# Altium PCB Zulu_a7_no_pmod.PcbDoc (part 3 of 5)
Units mm, origin at the board's own origin, x right, y up, seen from the top; angles counter-clockwise.
Board outline 60.96 x 25.4 mm, 6 copper layers (Top Layer, L2-GND, L3-SIG, L4-SIG, L5-VCC3V3, Bottom Layer), stack 1.65 mm thick; 194 components, 181 nets, 868 pads, 1982 vias.
Unrouted connection lines stored in the file: 27.
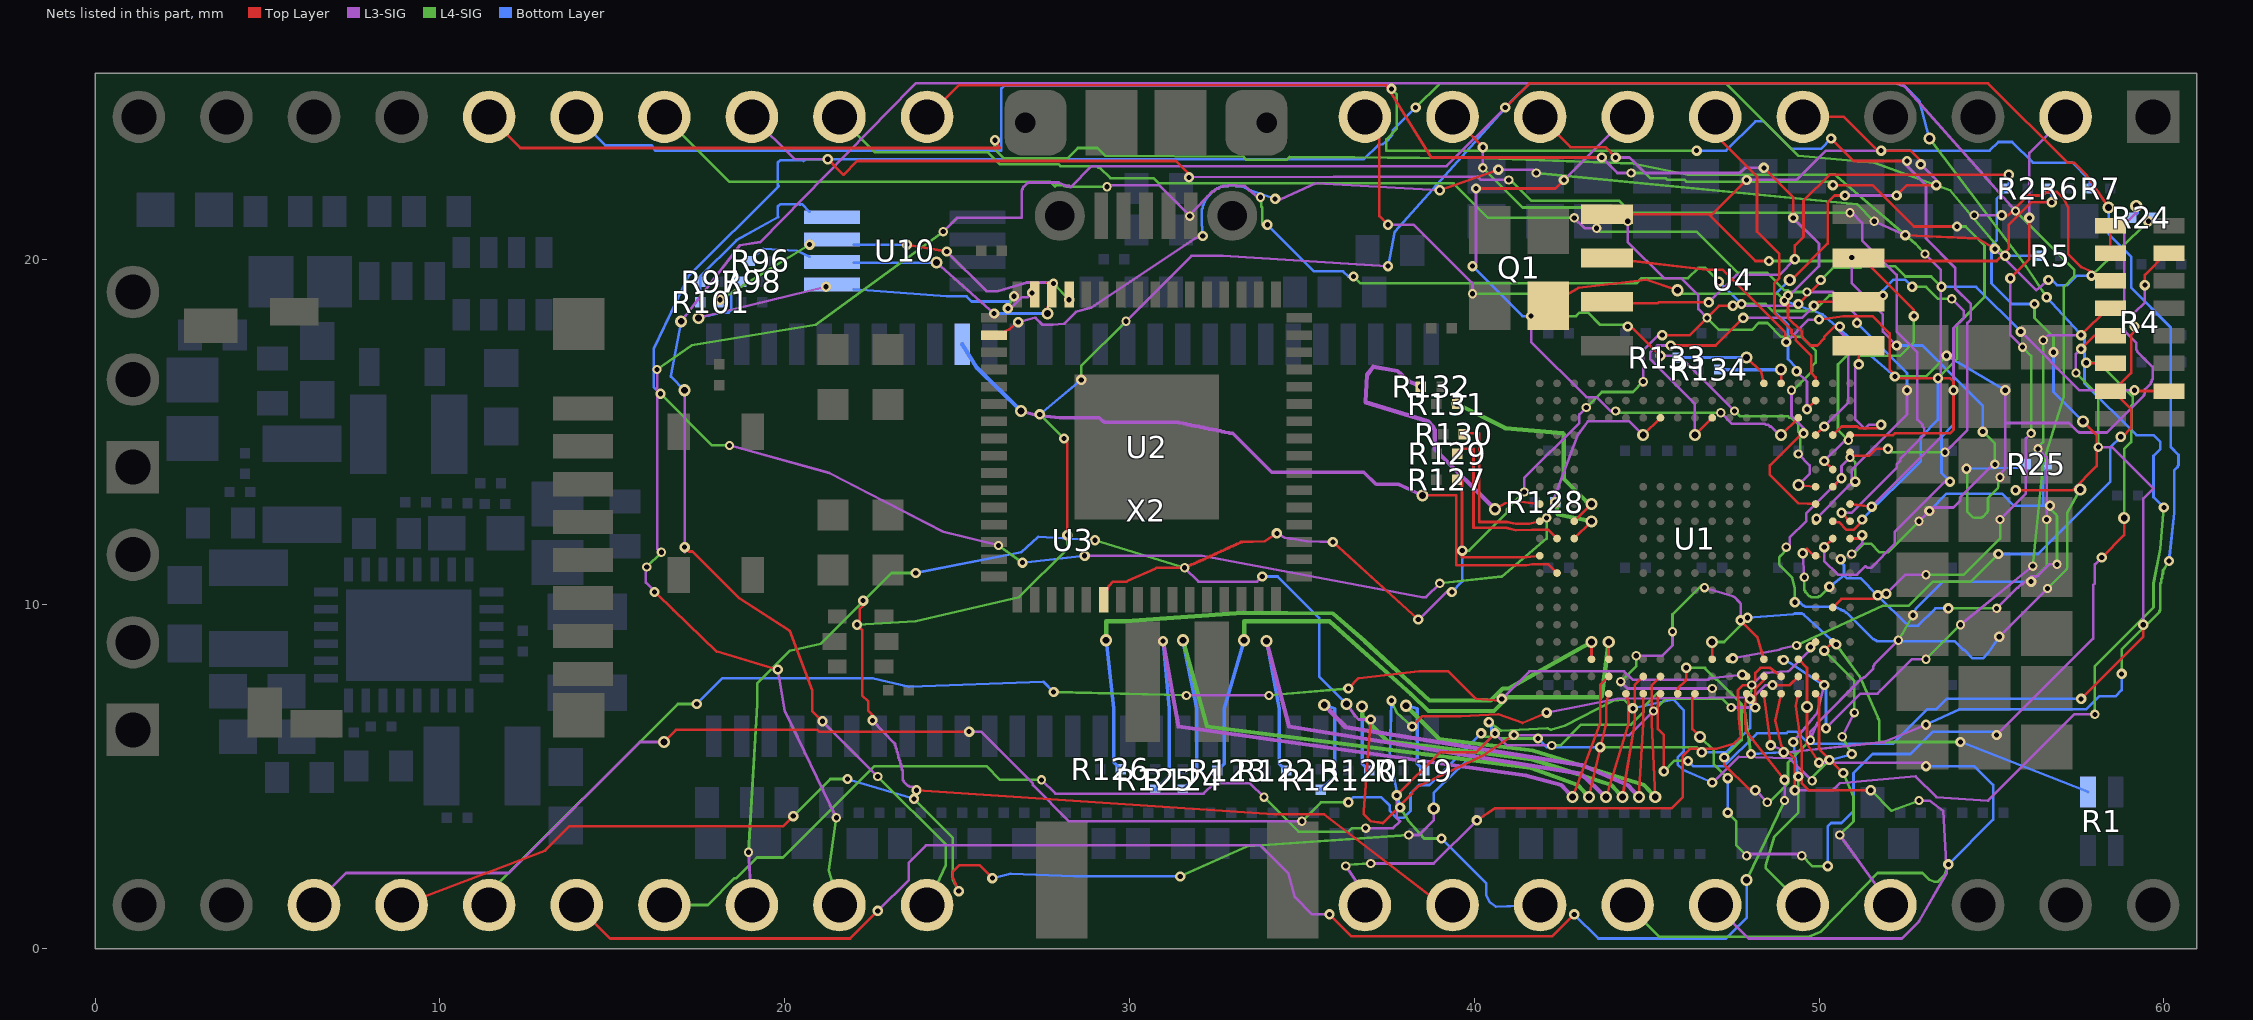
[diagram p6: the nets of this part, all layers, seen from the top]

## Via types
v1: diameter 0.27, hole 0.15, L3-SIG to L4-SIG, tented both sides, 400 vias
v2: diameter 0.3, hole 0.15, Top Layer to L2-GND, tented both sides, 336 vias
v3: diameter 0.35, hole 0.2, Top Layer to Bottom Layer, tented both sides, 322 vias
v4: diameter 0.3, hole 0.15, L5-VCC3V3 to Bottom Layer, tented both sides, 321 vias
v5: diameter 0.3, hole 0.15, L2-GND to L3-SIG, tented both sides, 302 vias
v6: diameter 0.3, hole 0.15, L4-SIG to L5-VCC3V3, tented both sides, 301 vias

## Nets (pads, with @x,y where several pads share a name; then routed paths per layer and width w, separated by ;. In a path a pad name is that pad's centre, name@x,y a point inside that pad or via, vN(x,y) a via of type N, cw(c..) or ccw(c..) an arc to the next point about the centre after c; other vN are vias at no path point) (continued)
CHAN2: U1.B17 X2.5 | length 15.6
  Top Layer w0.076: v3(49.15,19.4) 49.2,19.4 50.25,20.45 50.25,21.65 50.45,21.85 v2(50.75,21.85) ; X2.5@49.53,24.13 50.72,24.13 51.7,23.15 52.65,23.15 52.95,22.85 v2(52.95,22.75) ; v2(49.65,15.65) U1.B17@49.9,15.9 ; v2(52.25,21.85) 52.55,22.15 v2(53.4,22.15)
  L3-SIG w0.076: v1(49.35,16.75) 49.65,16.45 v2(49.65,15.65) ; v2(50.75,21.85) v2(52.25,21.85) ; v2(52.95,22.75) 53.4,22.3 v2(53.4,22.15)
  Bottom Layer w0.076: v3(49.15,19.4) 48.7,18.95 48.7,18.5 49.1,18.1 49.1,17.1 49.35,16.85 v1(49.35,16.75)
  other v4: 49.35,16.75
  other v5: 49.65,15.65 50.75,21.85 52.25,21.85 53.4,22.15 52.95,22.75
  other v6: 49.35,16.75
CHAN3: U1.A17 X2.6 | length 9.1
  Top Layer w0.076: X2.6@46.99,24.13 46.99,23.61 48.2,22.4 48.2,20.8 48.85,20.15 48.85,19.45 48.7,19.3 48.7,18.45 49.2,17.95 49.2,17.85 49.325,17.725 49.325,17.65 49.775,17.2 49.775,16.7 49.9,16.575 U1.A17@49.9,16.4
CHAN4: U1.C16 X2.7 | length 19.7
  Top Layer w0.076: v2(40.05,22.05) 42.35,22.05 v2(42.6,22.3) ; v3(48.9,14.9) U1.C16@49.4,15.4
  L3-SIG w0.076: v1(39.95,19.8) 40.05,19.9 v2(40.05,22.05) ; v1(41.65,18.35) 41.65,17.6 43.25,16 43.55,16 43.95,15.6 v1(44.1,15.6) ; v2(42.6,22.3) 44.43,24.13 X2.7@44.45,24.13 ; v1(47.15,15.55) 47.475,15.225 48.425,15.225 48.45,15.2 48.525,15.2 48.575,15.15 48.6,15.15 48.85,14.9 v3(48.9,14.9)
  L4-SIG w0.076: v1(44.1,15.6) 44.15,15.55 v1(47.15,15.55)
  Bottom Layer w0.076: v1(39.95,19.8) 41.4,18.35 v1(41.65,18.35)
  other v4: 41.65,18.35 39.95,19.8
  other v5: 40.05,22.05 42.6,22.3
  other v6: 41.65,18.35 39.95,19.8
CHAN5: U1.D17 X2.8 | length 18.5
  Top Layer w0.076: X2.8@41.91,24.13 42.79,23.25 43.8,23.25 v2(44.1,22.95) ; v2(48.4,22.65) 49.25,21.8 v2(49.25,21.2) ; v2(49.1,18.95) 49.1,18.3 49.5,17.9 49.5,17.75 49.75,17.5 49.95,17.5 50.15,17.7 50.15,17.75 50.45,18.05 v2(50.6,18.05) ; U1.D17@49.9,14.9 v2(50.15,15.15)
  L3-SIG w0.076: v2(44.1,22.95) 44.5,22.95 44.95,22.5 47.7,22.5 47.85,22.65 v2(48.4,22.65) ; v2(49.1,18.95) 49.15,18.95 50,19.8 50,20.45 v2(49.25,21.2) ; v2(50.15,15.15) 50.85,15.85 50.85,17.65 50.6,17.9 v2(50.6,18.05)
  other v5: 50.15,15.15 50.6,18.05 49.1,18.95 49.25,21.2 48.4,22.65 44.1,22.95
CHAN6: U1.H17 X2.9 | length 20.6
  Top Layer w0.076: X2.9@39.37,24.13 v2(40.25,23.25) ; v2(49.55,14.95) 49.5,14.95 48.575,14.025 48.575,13.745 49.4,12.92 U1.H17@49.9,12.9
  L3-SIG w0.076: v1(40.25,22.65) v2(40.25,23.25) ; v1(44.45,21.1) 44.45,20.5 45.5,19.45 46,19.45 46.5,18.95 46.5,18.55 v1(46.75,18.3) ; v1(49.2,16.2) 49.2,15.45 49.55,15.1 v2(49.55,14.95)
  L4-SIG w0.076: v1(40.25,22.65) 41.4,21.5 44.05,21.5 v1(44.45,21.1) ; v1(46.75,18.3) 47.1,17.95 48.05,17.95 48.25,18.15 48.5,18.15 48.9,17.75 49.5,17.75 49.9,17.35 49.9,17 49.8,16.9 49.8,16.75 49.25,16.2 v1(49.2,16.2)
  other v5: 49.55,14.95 40.25,23.25
CHAN7: U1.G17 X2.10 | length 19.8
  Top Layer w0.076: X2.10@37.25,23.55 37.25,21.25 v2(37.5,21) ; v2(44.45,18.05) 44.55,18.05 v2(45.4,17.2) ; v3(49.4,13.45) U1.G17@49.9,13.4
  L3-SIG w0.076: v2(37.5,21) 38.25,21 39.95,19.3 v1(39.95,19) ; v2(45.4,17.2) 45.95,17.2 v1(47.55,15.6) ; v3(49.4,13.45) 49.725,13.775 49.725,14.025 v1(49.4,14.35)
  L4-SIG w0.076: v1(39.95,19) 41.95,19 42.6,18.35 42.95,18.35 43.05,18.45 43.3,18.45 43.65,18.1 44.4,18.1 v2(44.45,18.05) ; v1(47.55,15.6) 47.7,15.45 49.1,15.45 49.15,15.4 49.2,15.4 49.4,15.2 49.4,15 49.45,14.95 49.45,14.4 v1(49.4,14.35)
  other v1: 44.45,18.05
  other v5: 45.4,17.2 44.45,18.05 37.5,21
CHAN8: U1.J18 X2.11 | length 43.8
  Top Layer w0.076: X2.11@24.13,24.13 25.05,25.05 36.65,25.05 37.45,25.05 38.75,22.95 v2(43.7,22.95) ; U1.J18@50.4,12.4 50.425,12.375 50.575,12.375 50.8,12.15 51,12.15 51.25,12.4 v2(51.25,12.45) ; v2(50.4,22.15) 51.55,22.15 52.75,20.95 v2(54,20.95)
  L3-SIG w0.076: v2(43.7,22.95) 44.15,22.5 v1(44.55,22.5)
  L4-SIG w0.076: v1(44.55,22.5) 44.95,22.5 45.1,22.35 45.55,22.35 45.6,22.3 46.1,22.3 46.15,22.25 50.3,22.25 v2(50.4,22.15) ; v6(53.45,16.55) 54,17.1 54,18.1 54.8,18.9 54.8,20.4 54.25,20.95 v2(54,20.95)
  Bottom Layer w0.076: v2(51.25,12.45) 52.95,14.15 52.95,14.85 53.45,15.35 v6(53.45,16.55)
  other v1: 51.25,12.45 54,20.95 50.4,22.15
  other v4: 51.25,12.45 53.45,16.55
  other v5: 51.25,12.45 54,20.95 50.4,22.15 43.7,22.95
  other v6: 51.25,12.45
CHAN9: U1.J17 X2.12 | length 39.5
  L3-SIG w0.076: v1(42.9,21.2) 43.2,20.9 v1(43.55,20.9) ; v1(49.65,19.05) 50.4,19.05 51.1,18.35 v1(51.1,18.15) ; v2(49.925,12.475) 50.925,13.5 50.95,13.55 50.95,13.9 52.55,15.5 v1(52.55,16.2)
  L4-SIG w0.076: X2.12@21.59,24.13 22.62,23.1 25.9,23.1 26.25,22.75 27.95,22.75 28,22.7 29.05,22.7 29.1,22.65 29.15,22.65 29.45,22.35 30.7,22.35 30.85,22.2 39.4,22.2 40.4,21.2 v1(42.9,21.2) ; v1(43.55,20.9) 43.65,20.8 46.45,20.8 47.65,19.6 48.5,19.6 49,19.1 49.1,19.1 49.15,19.05 v1(49.65,19.05)
  Bottom Layer w0.076: v1(51.1,18.15) 52.55,16.7 v1(52.55,16.2)
  other v4: 52.55,16.2 51.1,18.15
  other v5: 49.925,12.475
  other v6: 52.55,16.2 51.1,18.15
CHAN10: U1.J19 X2.13 | length 44.6
  Top Layer w0.076: v2(21.25,22.9) 21.7,22.45 22.1,22.85 31.35,22.85 31.7,22.5 v2(31.725,22.375) ; v2(50.65,12.65) U1.J19@50.9,12.4
  L3-SIG w0.076: X2.13@19.05,24.13 20.28,22.9 v2(21.25,22.9) ; v5@31.725,22.4 v2(31.725,22.375) 40.1,22.4 40.2,22.3 v1(41,22.3) ; v2(50.65,12.65) 50.95,12.65 52.25,13.95 52.25,14.05 52.35,14.15 52.35,14.2 53.05,14.9 53.05,15.1 53,15.15 53,15.2 52.85,15.35 52.85,17.3 52.25,17.9 52.25,19.55 51.25,20.55 51.25,21.05 50.95,21.35 v1(50.9,21.35)
  L4-SIG w0.076: v1(41,22.3) 41.05,22.3 41.65,21.7 44.2,21.7 44.55,21.35 v1(50.9,21.35)
  other v5: 50.65,12.65 31.725,22.375 21.25,22.9
CHAN11: U1.K18 X2.14 | length 53.9
  Top Layer w0.076: v2(50.15,11.65) U1.K18@50.4,11.9
  L3-SIG w0.076: v1(29.35,22.1) 29.4,22.15 30.85,22.15 v1(31.75,21.25) ; v1@31.725,21.275 32.425,21.975 32.45,21.975 32.5,22.025 32.55,22.05 32.575,22.05 32.6,22.075 32.65,22.1 32.7,22.1 32.725,22.125 32.85,22.125 32.875,22.15 33.075,22.15 33.1,22.125 33.35,22.125 33.475,22 33.5,22 33.7,21.8 v1(33.8,21.8) ; v2(50.15,11.65) 50.15,11.25 50.55,10.85 51.1,10.85 51.35,11.1 51.4,11.05 51.5,11.05 52.2,11.75 52.2,12.1 53.65,13.55 v1(53.8,13.55) ; v1(53.85,18.85) 54.2,18.5 54.2,18.3 53.9,18 v1(53.9,16.2)
  L4-SIG w0.076: X2.14@16.51,24.13 18.39,22.25 27.7,22.25 27.84,22.11 27.85,22.125 ; 27.825,22.125 27.85,22.125 ; 28.172,22.125 28.172,22.1 v1(29.35,22.1) ; 28.25,22.1 28.25,22.125 ; 28.275,22.1 28.25,22.125 ; v1(33.8,21.8) 33.825,21.575 33.825,21.525 33.85,21.5 33.85,21 v6(34,21) ; v6(36.5,19.5) 36.7,19.3 44.7,19.3 44.85,19.45 46.2,19.45 46.5,19.75 46.7,19.75 v6(47.1,19.35) ; v6(47.75,18.7) 48.45,18.7 48.65,18.5 49.85,18.5 50.3,18.95 v6(51.85,18.95) ; v6(52.7,19.2) 53.1,19.2 53.45,18.85 v1(53.85,18.85) ; 27.85,22.125 27.875,22.15 28.075,22.15 28.1,22.125 28.25,22.125
  Bottom Layer w0.076: v6(34,21) 35.35,19.65 36.2,19.65 36.35,19.5 v6(36.5,19.5) ; v6(47.1,19.35) v6(47.75,18.7) ; v6(51.85,18.95) 51.85,19.1 52.15,19.4 52.5,19.4 v6(52.7,19.2) ; v1(53.8,13.55) 53.55,13.8 53.55,14.85 53.9,15.2 v1(53.9,16.2)
  other v4: 53.8,13.55 53.9,16.2 47.75,18.7 51.85,18.95 52.7,19.2 47.1,19.35 36.5,19.5 34,21
  other v5: 50.15,11.65
  other v6: 53.8,13.55 53.9,16.2
CHAN12: U1.E19 X2.15 | length 56.5
  Top Layer w0.076: v2(50.35,23.5) 51,22.85 v2(52.55,22.85) ; U1.E19@50.9,14.4 51,14.3 51.45,14.3 51.65,14.5 v2(52,14.5)
  L3-SIG w0.076: v2(52.55,22.85) 52.55,22.7 53.1,22.15 53.1,20.6 53.95,19.75 53.95,19.15 54.4,18.7 54.4,18.25 54.3,18.15 54.3,15.05 v1(53.65,14.4)
  L4-SIG w0.076: v6(37.6,24.94) 37.75,24.79 37.75,23.78 37.45,23.477 37.45,23.15 v6(46.45,23.15) ; v2(52,14.5) 52.1,14.4 v1(53.65,14.4)
  Bottom Layer w0.076: X2.15@13.97,24.13 14.8,23.3 16.15,23.3 16.25,23.15 26.287,23.15 26.287,24.95 26.377,25.04 37.5,25.04 v6(37.6,24.94) ; v6(46.45,23.15) 47.3,23.15 48.15,24 48.4,24 49.2,23.2 50.05,23.2 v2(50.35,23.5)
  other v1: 52,14.5 50.35,23.5
  other v4: 46.45,23.15 50.35,23.5 37.6,24.94
  other v5: 52,14.5 52.55,22.85 50.35,23.5
  other v6: 50.35,23.5
CHAN13: U1.H19 X2.16 | length 53
  Top Layer w0.076: X2.16@11.43,24.13 12.335,23.225 26.242,23.225 v2(26.1,23.45) ; U1.H19@50.9,12.9 v2(51.525,12.825)
  L3-SIG w0.076: v2(51.525,12.825) 53.525,14.825 53.525,19.7 v1(53.075,20.15)
  L4-SIG w0.076: v2(26.1,23.45) 26.1,23.183 26.363,22.92 28.2,22.92 28.505,23.225 28.6,23.225 29.075,23.225 29.3,23 33.313,22.973 33.4,22.88 34.56,22.88 34.64,22.964 40.325,22.925 44.625,22.775 46.2,22.45 50.475,22.45 50.525,22.4 52.8,20.45 v1(53.075,20.15)
  other v1: 26.1,23.45
  other v5: 51.525,12.825 26.1,23.45
CHAN14: U1.W17 X2.24 | length 7.2
  Top Layer w0.076: U1.W17@49.9,7.4 50,7.3 50,5.8 v2(50.7,5.1)
  L3-SIG w0.076: v1(50.6,3.3) X2.24@52.07,1.27
  L4-SIG w0.076: v1(50.6,3.3) 51,3.7 51,4.4 v2(50.7,5.1)
  other v1: 50.7,5.1
  other v5: 50.7,5.1
CHAN15: U1.V17 X2.25 | length 7.8
  Top Layer w0.076: U1.V17@49.9,7.9 v2(50.15,7.65)
  L3-SIG w0.076: v1(49.25,6) 49.95,6.85 v2(50.15,7.65)
  L4-SIG w0.076: v6(49.4,5) 49.4,3.95 48.7,3.25 48.45,2.425 48.45,2.35 X2.25@49.53,1.27
  Bottom Layer w0.076: v1(49.25,6) v6(49.4,5)
  other v4: 49.4,5 49.25,6
  other v5: 50.15,7.65
  other v6: 49.25,6
CHAN16: U1.W16 X2.26 | length 17.1
  Top Layer w0.076: U1.W16@49.4,7.4 49.325,7.05 49.5,5.8 49.5,4.8 49.7,4.6 v2(51.5,4.6)
  L3-SIG w0.076: X2.26@46.99,1.27 47.96,0.3 52.4,0.3 52.9,0.8 53.7,2.2 53.6,4 53.2,4.3 v1(52.9,4.3)
  L4-SIG w0.076: v2(51.5,4.6) 52.1,4 v1(52.9,4.3)
  other v1: 51.5,4.6
  other v5: 51.5,4.6
CHAN17: U1.U16 X2.27 | length 22.2
  Top Layer w0.076: U1.U16@49.4,8.4 49.65,8.15 v3(49.65,7.02) 49.65,5.95 v2(50,5.4)
  L3-SIG w0.076: v2(50,5.4) 53,5.4 v1(53.1,5.3)
  L4-SIG w0.076: X2.27@44.45,1.27 45.37,0.35 49.7,0.35 50.05,0.5 51.7,2.2 53,2.2 53.2,2 53.35,1.95 53.45,1.95 53.65,2.15 v6(53.75,2.45)
  Bottom Layer w0.076: v1(53.1,5.3) 54.5,5.3 55.05,4.75 55.05,3.75 v6(53.75,2.45)
  other v4: 53.75,2.45 53.1,5.3
  other v5: 50,5.4
  other v6: 53.1,5.3
CHAN18: U1.V16 X2.28 | length 21.4
  Top Layer w0.076: v2(38.2,6.45) 38.5,6.75 39.6,6.75 40.7,6.8 41.4,6.55 v2(42.1,6.85) ; v2(48.65,7.65) 49.15,7.65 U1.V16@49.4,7.9
  L3-SIG w0.076: v2(42.1,6.85) 44.15,7.25 48.1,7.3 48.45,7.65 v2(48.65,7.65)
  L4-SIG w0.076: v6(37.6,7.2) 37.75,6.85 v2(38.2,6.45) ; v6(37.85,4.1) 38.1,3.7 38.55,3.2 v6(39.05,3.2)
  Bottom Layer w0.076: v6(37.6,7.2) 37.55,5.55 v6(37.85,4.1) ; v6(39.05,3.2) 40.35,1.9 40.35,1.55 40.45,1.35 40.625,1.225 X2.28@41.91,1.27
  other v1: 38.2,6.45
  other v4: 39.05,3.2 37.85,4.1 37.6,7.2
  other v5: 38.2,6.45 42.1,6.85 48.65,7.65
CHAN19: U1.W15 X2.29 | length 98.3
  Top Layer w0.076: v2(22.275,10.1) 22.275,9.95 22.175,9.85 22.175,9.475 v2(22.1,9.4) 22.25,9.25 22.25,7.35 22.425,7.175 22.425,6.9 22.55,6.775 v2(22.55,6.625) ; v2(23.825,4.6) 34.2,3.9 35.65,3.9 X2.29@38.8,1.475 ; v2(28.1,14.8) 28.2,14.7 v2(28.2,12) ; U1.W15@48.9,7.4 48.725,6.625 48.9,5.9 49.3,5.5 v2(49.3,4.6)
  L3-SIG w0.076: v2(22.55,6.625) 23.175,5.975 23.2,5.95 23.2,5.9 23.225,5.875 23.225,5.825 23.25,5.8 23.25,5.725 23.275,5.7 23.275,5.65 23.3,5.625 23.3,5.55 23.325,5.525 23.325,5.475 23.35,5.45 23.35,5.375 23.375,5.35 23.375,5.3 23.4,5.275 23.4,5.2 23.425,5.175 23.425,4.9 23.45,4.875 23.45,4.85 23.575,4.725 23.6,4.725 23.625,4.7 23.725,4.7 v2(23.825,4.6) ; v1(29.9,18.2) 31.8,20.1 32.7,20.1 v1(37.5,19.8) ; v2(49.3,4.6) 50.4,4.6 50.6,4.8 52.8,5 53.4,4.4 54.9,4.3 57.4,6.8 v1(58,6.8)
  L4-SIG w0.076: v2(22.1,9.4) 23.8,9.5 26.8,10.2 28.2,11.6 v2(28.2,12) ; v6(27.4,15.5) v2(28.1,14.8) ; v6(28.6,16.5) 28.6,16.9 v1(29.9,18.2) ; v3(53.2,23.5) 56,19.8 v6(56.6,18.9) ; v1(58,6.8) 58,8.2 59.7,9.9 59.7,10.6 59.9,11.6 v6(60,12.8)
  Bottom Layer w0.076: v6(27.4,15.5) v6(28.6,16.5) ; v1(37.5,19.8) 37.7,20.8 41.1,24.6 41.6,25.1 52.4,25.1 52.9,24.6 v3(53.2,23.5) ; v6(56.6,18.9) 57.7,17.7 57.7,16.4 59.2,14.9 59.7,14.9 59.9,14.7 59.9,14.5 59.7,14.3 59.7,13.1 v6(60,12.8)
  other v1: 22.1,9.4 28.2,12 28.1,14.8
  other v4: 60,12.8 27.4,15.5 28.6,16.5 56.6,18.9 37.5,19.8
  other v5: 23.825,4.6 49.3,4.6 22.55,6.625 22.1,9.4 28.2,12 28.1,14.8
  other v6: 37.5,19.8
CHAN20: U1.V15 X2.30 | length 17.4
  Top Layer w0.076: v2(40.075,3.725) 40.6,4.075 45.725,4.075 46.05,4.4 46.05,5.6 46.25,5.8 47.025,5.8 47.525,5.95 47.725,6.125 47.675,6.7 47.65,7.475 47.65,7.5 47.8,7.65 48,7.65 48.15,7.8 48.15,8 48.3,8.15 48.575,8.15 U1.V15@48.9,7.9
  L3-SIG w0.076: v1(36.275,2.4) X2.30@36.65,1.85 ; v1(37,2.475) 38.825,2.475 v2(40.075,3.725)
  L4-SIG w0.076: v1@36.274,2.435 36.275,2.425 v1(36.275,2.4) 36.273,2.435 v1(37,2.475)
  other v5: 40.075,3.725
CHAN21: U1.U15 X2.31 | length 85.7
  Top Layer w0.076: v2(17.1,11.65) 17.225,11.525 17.325,11.525 18.675,10.175 20.15,9.225 20.8,7.5 20.8,6.9 v2(21.1,6.6)
  L3-SIG w0.076: v3(17,18.2) 18.7,20.4 19.3,20.5 23.7,25 23.8,25.1 52.2,25.1 52.5,25 v1(55.7,21.4) ; 17.1,11.5 v3(17.1,16.2) ; v2(21.1,6.6) v1(22.7,5) ; v1(50.2,6.4) 51.2,7.4 51.7,7.4 52.7,8.4 v1(53.1,8.4) ; v1(54.1,9.4) v1(56.2,11.1)
  L4-SIG w0.076: v1(22.7,5) 24.675,3.025 24.675,2.425 X2.31@24.13,1.27 ; v1(53.1,8.4) v1(54.1,9.4) ; v1(55.7,21.4) 57.4,19.7 57.4,19.5 57.1,19.2 57.1,16 56.5,14.1 v1(56.2,11.1)
  Bottom Layer w0.076: v3(17,18.2) 16.7,16.6 v3(17.1,16.2) ; v6(48.975,8.375) 49.15,8.3 50.2,7.6 v1(50.2,6.4)
  other v1: 48.975,8.375
  other v2: 48.975,8.375
  other v4: 50.2,6.4 48.975,8.375
  other v5: 21.1,6.6 48.975,8.375 17.1,11.65
  other v6: 50.2,6.4
CHAN22: U1.W14 X2.32 | length 93.4
  Top Layer w0.076: v2(16.225,10.35) 16.625,9.975 16.775,9.825 18.025,8.625 v2(19.8,8.1) ; v2(40.9,24.4) 41.6,25.1 54.9,25.1 57.2,22.8 57.4,22.8 57.75,22.45 v3(58.4,21.5) ; U1.W14@48.4,7.4 v2(48.6,5.9)
  L3-SIG w0.076: v1(16,11.075) 15.975,10.925 15.975,10.625 16.225,10.375 v2(16.225,10.35) ; v1(16.3,16.8) 16.3,11.6 16.45,11.45 v1@16.475,11.475 ; v1@16.425,11.475 v1(16.425,11.5) ; v2(19.8,8.1) 20,6.9 v1(21.5,3.8) ; v1(24.6,20.8) 25,21.2 26.875,21.2 26.875,22 26.9,22.025 26.9,22.05 26.925,22.1 27.025,22.2 27.05,22.2 27.075,22.225 27.95,22.225 28.125,22.15 28.15,22.125 28.25,22.125 28.275,22.1 ; 28.3,22.1 28.275,22.1 ; v2(40.9,24.4) 39.2,22.7 28.9,22.7 28.287,22.087 28.275,22.1 ; v2(48.6,5.9) 49.1,5.7 51.9,6 v1(53.1,6.5)
  L4-SIG w0.076: v1(16,11.075) v1(16.425,11.5) ; v1(16.3,16.8) 17.3,17.5 20.9,18.1 v1(24.6,20.8) ; v1(21.5,3.8) 21.275,2.275 X2.32@21.59,1.27 ; v6(58.775,7.975) 58.775,8.675 59.875,9.775 59.875,9.8 59.9,9.825 59.9,10.6 59.925,10.625 59.925,10.725 59.95,10.75 59.95,10.85 59.975,10.875 59.975,10.975 60,11 v6(60.15,11.25)
  Bottom Layer w0.076: v1(53.1,6.5) 54.075,6.95 57.75,6.95 58.125,7.325 58.6,7.325 58.775,7.5 v6(58.775,7.975) ; v3(58.4,21.5) 58.4,20.725 59.05,20.075 59.05,19.175 60.2,18.025 60.2,14.55 60.425,14.325 60.425,14.025 60.4,14 60.4,13.975 60.3,13.875 60.3,12.65 v6(60.15,11.25)
  other v4: 53.1,6.5 58.775,7.975 60.15,11.25
  other v5: 48.6,5.9 19.8,8.1 16.225,10.35 40.9,24.4
  other v6: 53.1,6.5
CHAN23: U1.V14 X2.33 | length 45.4
  Top Layer w0.076: v2(37,6.65) 36.8,4 36.8,3.9 37,3.7 37.35,3.65 38.2,4.5 38.2,4.55 38.35,4.7 40.25,5.6 v2(41.15,6.2) ; v2(48.15,7) 48.15,7.55 48.4,7.8 U1.V14@48.4,7.9
  L3-SIG w0.076: v1(18.95,2.8) X2.33@19.05,1.27 ; v1(31.6,11.05) 32,10.65 33.7,10.65 v1(33.85,10.8) ; v3(36.3,7.1) 36.55,6.75 36.65,6.65 v2(37,6.65) ; v2(41.15,6.2) 44.5,6.2 v1(45.2,6.9) ; v1(47.45,7) v2(48.15,7)
  L4-SIG w0.076: v1(18.95,2.8) 19.2,7.1 19.2,7.7 20.15,8.65 21.05,8.85 23.1,10.9 v6(23.8,10.9) ; v6(29,11.85) v1(31.6,11.05) ; v1(45.2,6.9) 45.55,7.25 47.2,7.25 v1(47.45,7)
  Bottom Layer w0.076: v6(23.8,10.9) 26.85,11.5 27.35,11.95 v6(29,11.85) ; v1(33.85,10.8) 34.3,10.8 35.5,9.6 35.5,7.9 v3(36.3,7.1)
  other v4: 33.85,10.8 23.8,10.9 29,11.85
  other v5: 41.15,6.2 37,6.65 48.15,7
  other v6: 33.85,10.8
CHAN24: U1.U14 X2.34 | length 45.8
  Top Layer w0.076: v2(37.75,4.45) 39,5.7 40.05,5.7 v2(40.6,6.25) ; v2(47.725,9.525) 48.2,9.05 48.225,9 U1.U14@48.375,8.475
  L3-SIG w0.076: v1(27.45,4.9) 27.85,4.5 32.15,4.5 32.45,4.8 33.5,4.8 v1(33.9,4.4) ; v1(36.85,3.5) 37.65,3.5 37.85,3.7 37.75,3.8 v2(37.75,4.45) ; v2(40.6,6.25) 40.95,5.9 v1(42.25,5.9) ; v1(44.25,7.75) 44.45,7.55 v1(46.9,7.55) ; v1(44.7,8.5) 45.45,8.5 45.75,8.8 v1(45.75,9.2) ; v1(46.675,10.475) 47.5,10.225 47.55,10.2 47.7,10.05 47.725,10 v2(47.725,9.525)
  L4-SIG w0.076: X2.34@16.51,1.27 17.77,1.27 18.55,2.05 18.6,2.05 19.2,2.65 19.95,2.65 22.6,5.3 25.85,5.3 26.25,4.9 v1(27.45,4.9) ; v1(33.9,4.4) 34.9,3.4 36.35,3.4 36.45,3.5 v1(36.85,3.5) ; v1(42.25,5.9) 42.5,5.9 43.1,6.5 44.55,6.5 44.9,6.85 44.9,7 45.45,7.55 v1(46.9,7.55) ; v1(44.25,7.75) 44.7,8.2 v1(44.7,8.5) ; v1(45.75,9.2) 45.75,9.7 46.6,10.55 v1(46.675,10.475)
  other v5: 37.75,4.45 40.6,6.25 47.725,9.525
CHAN25: U1.W13 X2.35 | length 45
  Top Layer w0.076: X2.35@13.97,1.27 14.94,0.3 21.9,0.3 v2(22.7,1.1) ; v2(35.8,1) 36.44,0.36 42.26,0.36 v2(42.9,1) ; U1.W13@47.9,7.4 47.85,6.975 47.875,6.325 v2(49,4.9)
  L3-SIG w0.076: v2(22.7,1.1) 23.6,2 23.6,2.5 24.1,3 33.8,3 34.6,2.2 34.8,1.5 35.3,1 v2(35.8,1) ; v1(49,4.3) v2(49,4.9)
  L4-SIG w0.076: v3(47.9,2) v1(49,4.3)
  Bottom Layer w0.076: v2(42.9,1) 43.6,0.3 47.3,0.3 47.9,0.9 v3(47.9,2)
  other v1: 42.9,1
  other v4: 42.9,1
  other v5: 35.8,1 42.9,1 22.7,1.1 49,4.9
  other v6: 42.9,1
CHAN26: U1.V13 X2.36 | length 40.5
  Top Layer w0.076: v2(36.35,7.55) 36.65,7.85 38.4,8.05 39.25,8.05 40.05,7.25 40.75,7.2 v2(40.8,7.25) ; v2(47.775,7.95) U1.V13@47.825,7.925
  L3-SIG w0.076: v1(31.65,7.35) v1(34.05,7.35) ; v2(40.8,7.25) 41.6,8.05 44.35,8.05 44.6,7.8 46.8,7.8 ; 46.775,7.8 46.8,7.825 46.85,7.85 v2(47.775,7.95)
  L4-SIG w0.076: X2.36@11.43,1.27 11.43,1.63 16.9,7.1 v6(17.45,7.1) ; v6(27.8,7.45) v1(31.65,7.35) ; v1(34.05,7.35) v2(36.35,7.55)
  Bottom Layer w0.076: v6(17.45,7.1) 18.2,7.85 22.55,7.85 23.6,7.6 27.5,7.75 v6(27.8,7.45)
  other v1: 36.35,7.55
  other v4: 17.45,7.1 27.8,7.45
  other v5: 40.8,7.25 36.35,7.55 47.775,7.95
CHAN27: U1.T18 X2.37 | length 55.8
  Top Layer w0.076: X2.37@8.89,1.27 13.05,2.85 13.75,3.55 19.95,3.55 v2(20.25,3.85) ; v2(25.05,1.675) 24.875,2.075 24.875,2.225 25.075,2.425 25.65,2.425 v2(26.025,2.05) ; v2(50.15,8.65) U1.T18@50.4,8.9
  L3-SIG w0.076: v1(38.1,3.3) 38.4,3.3 38.825,3.725 v3(38.825,4.075) ; v1(46.9,4.825) 46.925,4.825 47.675,5.575 49.15,5.525 v1(49.8,4.875) ; v1(50.675,6.15) v1(51.025,6.85)
  L4-SIG w0.076: v2(20.25,3.85) 21.325,4.925 v6(21.825,4.925) ; v6(23.75,4.35) 24.875,3.225 24.875,2 v2(25.05,1.675) ; v6(31.475,2.1) 33.425,2.975 v1(38.1,3.3) ; v6(40.425,6.575) 40.775,6.325 42.125,6.4 42.225,6.35 42.625,6.475 44.025,7.2 44.35,7.225 v6(44.6,6.975) ; v1(49.8,4.875) 49.8,4.975 v6(50.3,5.475) ; v2(50.15,8.65) 51.025,7.775 v1(51.025,6.85) ; v1(50.675,6.15) v6(50.95,5.65)
  Bottom Layer w0.076: v6(21.825,4.925) v6(23.75,4.35) ; v2(26.025,2.05) 26.55,2.175 28.4,2.1 v6(31.475,2.1) ; v3(38.825,4.075) 38.825,4.525 38.95,4.65 40.5,6.15 40.5,6.5 v6(40.425,6.575) ; v6(44.6,6.975) 45.6,7.2 45.775,7.225 46.075,6.925 46.075,5.725 45.9,5.55 45.9,5.35 46.05,5.2 v1(46.9,4.825) ; v6(50.3,5.475) v6(50.95,5.65)
  other v1: 25.05,1.675 26.025,2.05 20.25,3.85 50.15,8.65
  other v4: 26.025,2.05 31.475,2.1 23.75,4.35 46.9,4.825 21.825,4.925 50.3,5.475 50.95,5.65 40.425,6.575 44.6,6.975
  other v5: 25.05,1.675 26.025,2.05 20.25,3.85 50.15,8.65
  other v6: 26.025,2.05 46.9,4.825
CHAN28: U1.T17 X2.38 | length 51
  Top Layer w0.076: v3(16.5,6) 16.85,6.35 20.95,6.35 21,6.3 v2(25.35,6.3) ; v2(49.75,8.75) U1.T17@49.85,8.85
  L3-SIG w0.076: X2.38@6.35,1.27 7.28,2.2 12,2.2 15.8,6 v3(16.5,6) ; v2(25.35,6.3) 25.7,6.3 27.2,4.8 27.2,4.75 28.25,3.7 v1(35,3.7) ; v1(48.05,7.65) 48.4,8 49.1,8.05 49.15,8.075 49.75,8.675 v2(49.75,8.75)
  L4-SIG w0.076: v1(35,3.7) 35.55,4.25 v6(36.35,4.25) ; v6(40.2,6.25) 40.3,6.15 40.7,6.15 40.75,6.1 v6(41.85,6.1) ; v6(43.65,5.85) 46.45,5.85 v6(46.6,5.7) ; v6@47.95,7.25 v6(48,7.25) v1(48.05,7.65)
  Bottom Layer w0.076: v6(36.35,4.25) 36.5,4.4 37.3,4.4 37.55,4.15 37.55,4 37.75,3.8 37.95,3.8 38.15,4 38.15,4.5 38.4,4.75 38.7,4.75 v6(40.2,6.25) ; v6(41.85,6.1) 42.1,5.85 v6(43.65,5.85) ; v6(46.6,5.7) 47.3,5.7 48,6.4 v6(48,7.25)
  other v4: 36.35,4.25 46.6,5.7 43.65,5.85 41.85,6.1 40.2,6.25 48,7.25
  other v5: 25.35,6.3 49.75,8.75
CHAN-CLK: U1.P18 X2.2 | length 19.2
  Top Layer w0.076: U1.P18@50.4,9.9 50.65,10.15 51.75,10.15 51.9,10.3 v2(51.95,10.3) ; v2(55.55,19.45) 56.1,20 v2(56.1,21.2)
  L3-SIG w0.076: v2(51.95,10.3) 52.5,10.85 v1(53.1,10.85) ; v1(55.25,12.45) 56,13.2 56,14.8 v1(56.15,14.95) ; v2(55.55,19.45) 55.55,17.8 v1(55.9,17.45) ; v2(56.1,21.2) 56.1,23.08 X2.2@57.15,24.13
  L4-SIG w0.076: v1(53.1,10.85) 54.2,10.85 55.25,11.9 v1(55.25,12.45) ; v1(55.9,17.45) 56.15,17.2 v1(56.15,14.95)
  other v5: 51.95,10.3 55.55,19.45 56.1,21.2
CKE: U1.M2 U3.37 | length 21.2
  Top Layer w0.076: v3(38.5,13.15) 39.479,13.15 39.479,11.13 40.9,11.13 41.5,11.13 41.688,11.15 42.15,11.15 U1.M2@42.4,10.9
  L3-SIG w0.1: v3(26.85,15.6) 27.3,15.475 27.975,15.4 29.125,15.4 29.225,15.3 29.25,15.3 29.275,15.275 31.425,15.275 31.45,15.25 31.55,15.25 31.575,15.225 31.65,15.225 31.675,15.2 31.775,15.2 31.8,15.175 31.9,15.175 31.925,15.15 32.025,15.15 32.05,15.125 32.15,15.125 32.175,15.1 32.275,15.1 32.3,15.075 32.4,15.075 32.425,15.05 32.525,15.05 32.55,15.025 32.65,15.025 32.675,15 32.75,15 32.775,14.975 32.875,14.975 32.9,14.95 33,14.95 34.125,13.825 36.8,13.825 37.15,13.475 37.8,13.475 v3(38.5,13.15)
  Bottom Layer w0.125: U3.37@25.15,17.53 25.575,16.85 v3(26.85,15.6)
CLK-12M-FPGA: R25.2 U1.L17 | length 17.9
  Top Layer w0.076: v2(49.525,11.475) 49.65,11.6 U1.L17@49.825,11.425 ; U1.L17@49.975,11.375 U1.L17@50,11.375
  L3-SIG w0.076: v2(49.525,11.475) v1(49.575,10.775) ; v1(55.15,9.875) 55.75,10.475 55.775,10.475 55.875,10.575 55.9,10.575 56.025,10.7 56.05,10.7 56.15,10.8 56.3,10.8 56.35,10.825 56.675,11.15 v1(56.9,11.15)
  L4-SIG w0.076: v1(49.575,10.775) 49.575,10.4 49.6,10.375 49.6,10.35 49.725,10.225 49.75,10.225 49.775,10.2 49.975,10.2 50,10.225 50.025,10.225 v6(50.3,10.5) ; v6@53.1,12.8 v6(53.2,12.7) ; v6(53.75,9.875) v1(55.15,9.875) ; v6(56.7,12.85) 56.7,12.775 56.875,12.6 56.9,12.55 v1(56.9,11.15)
  Bottom Layer w0.076: v6(50.3,10.5) 50.725,10.825 ; v4(50.625,11.3) 50.65,11.2 50.725,11.125 50.725,10.825 ; v6(53.2,12.7) 53.7,13.2 55.3,13.2 55.65,12.85 56.5,12.85 ; v6(53.75,9.875) 53.375,9.875 52.875,9.375 52.575,9.375 v4(51.7,10.25) 51.2,10.75 50.8,10.75 50.725,10.825 ; R25.2@56.5,13.95 56.5,12.85 ; v6(56.7,12.85) 56.5,12.85
  other v4: 53.75,9.875 50.3,10.5 53.2,12.7 56.7,12.85
  other v5: 49.525,11.475
CLK-12M-FT: R24.2 U2.2 | length 37.8
  Top Layer w0.076: U2.2@26.35,17.9 26.525,17.975 v5(26.775,18.175) ; v2(39,22) v2(40.7,22.6) ; v2(52.5,20.7) 54.6,20.6 v2(55.1,20.3)
  L3-SIG w0.076: v5(26.775,18.175) 27.25,18.3 27.275,18.3 27.475,18.1 27.775,18.1 28.1,18.125 28.45,18.475 28.9,18.6 31.9,20.6 32.124,20.702 32.125,20.7 v1(32.125,20.675) v1@32.115,20.698 ; v1@34.258,21.678 v6(34.225,21.75) 34.225,21.675 34.23,21.665 35.4,22.2 v2(39,22) ; v2(40.7,22.6) 41.7,22.6 v1(41.8,22.5) ; v1(51.6,21.1) v2(52.5,20.7) ; v2(55.1,20.3) 56.3,19.1 v1(56.65,19.4)
  L4-SIG w0.076: v1(41.8,22.5) 51.1,21.6 v1(51.6,21.1) ; v6(57.9,19.525) v6(59.55,21.1)
  Bottom Layer w0.076: v1(32.125,20.675) 32.1,21.05 32.1,21.45 32.125,21.475 32.125,21.55 32.15,21.575 32.15,21.625 32.175,21.65 32.175,21.675 32.2,21.7 32.2,21.725 32.275,21.8 32.275,21.825 32.425,21.975 32.45,21.975 32.5,22.025 32.55,22.05 32.575,22.05 32.6,22.075 32.65,22.1 32.7,22.1 32.725,22.125 32.85,22.125 32.875,22.15 33.075,22.15 33.1,22.125 33.25,22.125 33.275,22.1 33.325,22.1 33.35,22.075 33.375,22.075 33.4,22.05 33.425,22.05 33.475,22 33.5,22 v6(34.225,21.75) ; v1(56.65,19.4) 56.75,19.4 56.9,19.25 57.2,19.25 57.475,19.525 v6(57.9,19.525)
  other v1: 34.225,21.75
  other v2: 26.775,18.175
  other v4: 56.65,19.4 57.9,19.525 32.125,20.675 59.55,21.1 34.225,21.75
  other v5: 55.1,20.3 52.5,20.7 39,22 40.7,22.6
  other v6: 56.65,19.4 32.125,20.675
CLK-12M-SHARED: Q1.3 R24.1 R25.1 | length 33.3
  Top Layer w0.076: Q1.3@42.15,18.65 43.025,19.175 45,19.4 v3(45.9,19.1)
  L3-SIG w0.076: v1(55.25,13.675) 55.25,13.775 55.375,13.9 55.4,13.95 v1(55.4,16.2) ; 55.4,15.25 57.25,15.25 57.5,15 57.525,15 57.55,14.975 58.35,14.975 59.425,16.05 59.425,16.075 59.45,16.1 59.45,16.225 59.625,16.4 59.625,16.425 59.65,16.45 59.65,16.5 59.675,16.525 59.675,16.875 59.225,17.325 59.225,17.35 59.2,17.375 59.2,17.575 58.875,17.9 58.875,17.925 58.85,17.95 58.85,21 59.2,21.35 v3(59.2,21.55)
  L4-SIG w0.076: v3(45.9,19.1) 46,19 48.8,19 v6(49,18.8) ; v6(52.2,16.6) 53.1,16.6 v6(53.7,17.2) ; v6(54.275,13.925) 54.3,13.725 54.3,12.675 54.45,12.525 54.5,12.5 54.7,12.5 54.725,12.525 54.75,12.525 54.875,12.65 54.875,12.675 54.9,12.7 54.9,13.075 55.175,13.35 55.2,13.4 55.2,13.625 v1(55.25,13.675)
  Bottom Layer w0.076: v6(49,18.8) 50.1,18.4 v6(52.2,16.6) ; v6(53.7,17.2) v1(55.4,16.2) ; v6(54.275,13.925) R25.1@55.9,13.95 ; R24.1@59.05,21.2 59.1,21.25 59.2,21.35
  Bottom Layer w0.15: 59.2,21.35 v3(59.2,21.55)
  other v4: 54.275,13.925 55.4,16.2 52.2,16.6 53.7,17.2 49,18.8
  other v6: 55.4,16.2
D0: R119.2 U1.V8 | length 13.8
  Top Layer w0.076: v3(45.25,4.4) 45.15,6.55 45.15,7.187 45.15,7.65 U1.V8@45.4,7.9
  L4-SIG w0.125: v3(38.025,7.05) 39,6.075 41.7,5.75 44.925,4.75 v3(45.25,4.4)
  Bottom Layer w0.1: v3(38.025,7.05) 38.35,6.97 38.35,5.37 R119.2@38.55,5.17
D1: R120.2 U1.V7 | length 14
  Top Layer w0.076: v3(44.3,4.4) 44.65,6.55 44.65,7.187 44.65,7.65 U1.V7@44.9,7.9
  L4-SIG w0.125: v3(36.75,7.025) 36.75,6.75 37.475,6.025 41.675,5.5 43.975,4.75 v3(44.3,4.4)
  Bottom Layer w0.1: v3(36.75,7.025) 36.75,6.97 36.75,5.37 R120.2@36.95,5.17
D2: R121.2 U1.W7 | length 15.6
  Top Layer w0.076: v3(44.775,4.4) 44.9,6.55 U1.W7@44.9,7.4
  L3-SIG w0.125: v3(35.65,7.075) 36.275,6.425 43.125,5.325 44.45,4.75 v3(44.775,4.4)
  Bottom Layer w0.1: R121.2@35.55,4.61 35.95,5.01 35.95,6.97 v3(35.65,7.075)
D3: R122.2 U1.W6 | length 19.1
  Top Layer w0.076: v3(43.825,4.4) 44.475,6.55 44.475,7.15 U1.W6@44.4,7.4
  L3-SIG w0.125: v3(33.975,8.925) 34.625,6.45 43.1,5.075 v3(43.825,4.4)
  Bottom Layer w0.1: v3(33.975,8.925) 34.35,6.97 34.35,5.37 R122.2@34.55,5.17
D4: R123.2 U1.U5 | length 18.1
  Top Layer w0.076: U1.U5@43.9,8.4 v3(43.9,8.9)
  L4-SIG w0.125: v3(33.325,8.95) 33.325,9.5 33.875,9.5 35.8,9.5 38.175,7.375 38.675,6.9 40.575,6.9 40.975,7.3 43.675,7.3 43.7,7.325 v3(43.9,8.9)
  Bottom Layer w0.1: R123.2@32.55,5.17 32.75,5.37 32.75,6.97 v3(33.325,8.95)
D5: R124.2 U1.W5 | length 21.6
  Top Layer w0.076: v3(43.325,4.4) 43.825,6.55 43.825,7.15 U1.W5@43.9,7.4
  L4-SIG w0.125: v3(31.55,8.95) 32.25,6.45 41.65,5.25 43,4.75 v3(43.325,4.4)
  Bottom Layer w0.1: R124.2@31.55,4.61 31.95,5.01 31.95,6.97 v3(31.55,8.95)
D6: R125.2 U1.V5 | length 22.5
  Top Layer w0.076: v3(42.85,4.4) 43.65,6.55 43.65,7.187 43.65,7.65 U1.V5@43.9,7.9
  L3-SIG w0.125: v6(30.975,8.925) 31.425,6.45 41.5,5.025 42.525,4.75 v3(42.85,4.4)
  Bottom Layer w0.1: R125.2@30.75,4.61 31.15,5.01 31.15,6.97 v6(30.975,8.925)
  other v1: 30.975,8.925
  other v4: 30.975,8.925
D7: R126.2 U1.U4 | length 20.4
  Top Layer w0.076: U1.U4@43.4,8.4 v3(43.4,8.9)
  L4-SIG w0.125: v3(29.325,8.95) 29.325,9.5 29.875,9.5 33.3,9.75 35.9,9.725 36.825,8.925 38.7,7.2 40.475,7.2 40.825,7.55 41,7.55 v3(43.4,8.9)
  Bottom Layer w0.1: v3(29.325,8.95) 29.55,6.97 29.55,5.41 R126.2@29.75,5.21
D8: R127.2 U1.L1 | length 4.6
  Top Layer w0.076: R127.2@39.5,13.6 39.646,13.6 39.646,11.36 40.9,11.36 41.5,11.36 U1.L1@41.9,11.4
D9: R128.2 U1.K3 | length 2.1
  Top Layer w0.076: U1.K3@42.9,11.9 v3(43.4,12.4)
  L4-SIG w0.125: v6(42.35,12.95) 42.425,12.6 v3(43.4,12.4)
  other v4: 42.35,12.95
D10: R129.2 U1.K2 | length 5.4
  Top Layer w0.076: R129.2@39.51,14.36 39.65,14.5 39.979,14.5 39.979,12.21 40.9,12.21 40.95,12.205 41.2,12.14 41.688,12.15 42.15,12.15 U1.K2@42.4,11.9
D11: R130.2 U1.J1 | length 4.8
  Top Layer w0.076: R130.2@39.7,14.92 39.7,14.95 40.145,14.95 40.145,12.38 40.95,12.38 41.2,12.33 41.6,12.33 U1.J1@41.9,12.4
D12: R131.2 U1.J3 | length 6.4
  Top Layer w0.076: U1.J3@42.9,12.4 v3(43.4,12.9)
  L4-SIG w0.125: v2(39.49,15.81) 40.9,15.1 42.575,14.95 42.6,14.925 42.6,13.625 43.225,13 v3(43.4,12.9)
  other v1: 39.49,15.81
  other v5: 39.49,15.81
D13: R132.2 U1.H1 | length 9.2
  Top Layer w0.076: v3(40.6,12.75) 40.9,12.92 41.15,12.97 41.35,12.97 U1.H1@41.9,12.9
  L3-SIG w0.125: v2(38.45,16.304) 38.11,16.46 37.77,16.76 37.07,16.88 36.89,16.64 36.847,15.85 38.65,15.3 38.8,15.15 38.85,15.05 38.85,14.5 v3(40.6,12.75)
  other v5: 38.45,16.304
D14: R133.2 U1.A14 | length 2.9
  Top Layer w0.076: v3(47.9,17.15) 48.325,16.725 U1.A14@48.4,16.4
  Bottom Layer w0.1: R133.2@45.9,17.15 v3(47.9,17.15)
D15: R134.2 U1.A15 | length 2.2
  Top Layer w0.076: U1.A15@48.9,16.4 v3(48.9,16.8)
  Bottom Layer w0.1: R134.2@47.1,16.8 v3(48.9,16.8)
DONE: R4.2 U2.22 | length 39.6
  Top Layer w0.076: U2.22@29.35,10.4 29.4,10.525 29.525,10.65 29.925,10.65 29.95,10.675 30.75,11.025 30.775,11.05 31.625,11.05 31.65,11.075 31.675,11.075 31.7,11.1 31.725,11.1 31.75,11.125 31.775,11.125 31.8,11.15 31.85,11.15 31.875,11.175 31.9,11.175 31.925,11.2 31.95,11.2 31.975,11.225 32,11.225 32.025,11.25 32.05,11.25 32.075,11.275 32.125,11.275 32.15,11.3 32.175,11.3 32.225,11.325 32.25,11.35 32.275,11.35 32.3,11.375 32.325,11.375 32.35,11.4 32.4,11.4 32.425,11.425 32.45,11.425 32.475,11.45 32.5,11.45 32.525,11.475 32.55,11.475 32.575,11.5 32.6,11.5 32.65,11.525 32.675,11.55 32.725,11.55 32.75,11.575 32.775,11.575 32.8,11.6 32.825,11.6 32.85,11.625 32.875,11.625 32.9,11.65 32.925,11.65 32.95,11.675 33,11.675 33.025,11.7 33.05,11.7 33.075,11.725 33.1,11.725 33.125,11.75 33.15,11.75 33.2,11.775 33.225,11.8 33.275,11.8 33.925,11.825 v2(34.275,12.05) ; v2(35.9,11.8) v2(38.375,9.55) ; v2(45.45,17.8) 46.25,17.8 47.1,18.65 v2(47.5,18.65) ; v2(49.4,18.7) 50.05,19.35 v2(50.05,19.4) ; v2(59.15,16.2) 59.172,16.178 R4.2@60.15,16.178
  L3-SIG w0.076: v2(34.275,12.05) 34.5,11.925 34.65,11.9 34.825,11.875 34.975,11.85 35.15,11.825 v2(35.9,11.8) ; v2(38.375,9.55) 38.4,9.55 39.2,10.35 v1(39.35,10.35) ; v1(41.45,13.25) 41.45,13.65 43.05,15.25 43.05,15.5 v1(43.25,15.7) ; v1(44.9,16.45) 44.9,17.35 45.35,17.8 v2(45.45,17.8) ; v2(47.5,18.65) 49.35,18.65 v2(49.4,18.7) ; v1(55.85,17.9) 57.55,16.2 v2(59.15,16.2)
  L4-SIG w0.076: v6(39.65,11.55) 39.85,11.55 40.95,12.65 40.95,12.75 v1(41.45,13.25) ; v1(43.25,15.7) 43.7,16.15 44.6,16.15 v1(44.9,16.45) ; v2(50.05,19.4) 50.4,19.75 51.2,19.75 51.25,19.8 52.2,19.8 52.5,19.5 53.25,19.5 v6(53.55,19.2)
  Bottom Layer w0.076: v1(39.35,10.35) 39.65,10.65 v6(39.65,11.55) ; v6(53.55,19.2) 54.55,19.2 v1(55.85,17.9)
  other v1: 50.05,19.4
  other v4: 39.35,10.35 39.65,11.55 55.85,17.9 53.55,19.2
  other v5: 38.375,9.55 35.9,11.8 34.275,12.05 59.15,16.2 45.45,17.8 47.5,18.65 49.4,18.7 50.05,19.4
  other v6: 39.35,10.35 55.85,17.9
DONE-PU: R4.9 R4.10 | length 0.8
  Top Layer w0.076: R4.10@58.45,20.178 R4.9@58.45,20.978
EE-CLK: R96.1 U2.62 U10.2 | length 8.3
  Top Layer w0.076: v3(27.625,18.425) U2.62@27.65,18.7 ; U2.62@27.625,19.325 U2.62@27.65,19.25
  L3-SIG w0.076: v3(24.4,19.9) v1(26.075,18.425)
  Bottom Layer w0.076: R96.1@19.1,20.05 19.325,20.275 19.35,20.275 19.375,20.3 20.35,20.25 U10.2@20.725,20.075 ; U10.2@22,19.9 v3(24.4,19.9) ; v1(26.075,18.425) v3(27.625,18.425)
  other v4: 26.075,18.425
  other v6: 26.075,18.425
EE-CS: R98.1 U2.63 U10.1 | length 11.7
  L3-SIG w0.076: v3(17.5,18.3) v1(21.2,19.2) ; v6(26.475,18.575) 26.55,18.575 26.85,18.875 26.9,18.9 27.05,18.9 v2(27.175,19.025)
  L4-SIG w0.076: v6(26.475,18.575) v6(26.65,18.925)
  Bottom Layer w0.076: v3(17.5,18.3) 18.05,18.425 18.075,18.45 18.375,18.45 18.45,18.525 18.45,18.975 18.625,19.15 R98.1@18.65,19.25 ; U10.1@22,19.125 24.7,18.925 25.1,18.925 25.275,18.925 25.425,18.775 26.5,18.775 v6(26.65,18.925)
  other v1: 26.475,18.575
  other v4: 26.65,18.925 21.2,19.2
  other v5: 27.175,19.025
  other v6: 21.2,19.2
EE-DATA: R101.2 U2.61 U10.3 | length 10.1
  Top Layer w0.076: v6(23.55,20.425) v2(24.7,20.225)
  L3-SIG w0.076: v2(24.7,20.225) 25.85,19.075 26.175,19.075 27.025,19.325 27.8,19.325 v1(27.8,19.3)
  L4-SIG w0.076: v6(18.125,18.825) v6(20.725,20.425) ; v1(27.8,19.3) v1(28.25,18.825)
  Bottom Layer w0.076: U10.3@22,20.425 v6(23.55,20.425)
  other v1: 23.55,20.425
  other v2: 28.25,18.825 23.55,20.425
  other v4: 18.125,18.825 20.725,20.425 23.55,20.425
  other v5: 28.25,18.825 24.7,20.225 23.55,20.425
EE-DATA-DO: R97.1 R101.1 U10.4 | length 5
  Bottom Layer w0.076: R101.1@17.55,18.75 R97.1@17.55,19.35 17.55,19.5 18.6,20.55 19.812,21.225 19.8,21.225 19.8,21.525 19.875,21.6 20.475,21.6 20.477,21.596 ; 20.445,21.6 20.445,21.578 20.5,21.6 U10.4@20.725,21.375
FLASH-CS#: R7.1 U1.K19 U4.1 | length 35
  Top Layer w0.076: U4.1@43.85,21.305 46.795,21.305 ; v2(47.9,22.3) 46.905,21.305 46.795,21.305 ; v2(48.55,19.95) 48.15,19.95 46.795,21.305 ; U1.K19@50.9,11.9 51.15,11.9 v2(51.25,12)
  L3-SIG w0.076: v2(47.9,22.3) 49.35,22.3 50.2,23.15 v1(51.8,23.15) ; v1(50.95,11.45) 51.25,11.75 v2(51.25,12) ; v1(50.95,20.05) 50.95,19.3 51.85,18.4 51.85,17.9 v1(52.25,17.5) ; v1(52.9,12.4) 53.3,12.8 53.9,12.8 54.1,13 54.1,13.1 55.05,14.05 v1(55.1,14.05)
  L4-SIG w0.076: v2(48.55,19.95) 50.85,19.95 v1(50.95,20.05) ; v1(50.95,11.45) 51,11.45 51.3,11.75 51.5,11.75 51.75,11.5 52,11.5 v1(52.9,12.4) ; v6(54.75,15) 55.1,14.65 v1(55.1,14.05)
  Bottom Layer w0.076: v1(51.8,23.15) 54.95,23.15 55.2,23.4 55.6,23.4 56.2,22.8 57.35,22.8 57.85,22.3 R7.1@57.849,22.05 ; v1(52.25,17.5) 53,17.5 54.75,15.75 v6(54.75,15)
  other v1: 48.55,19.95
  other v4: 54.75,15 52.25,17.5 51.8,23.15
  other v5: 51.25,12 48.55,19.95 47.9,22.3
  other v6: 52.25,17.5 51.8,23.15
FLASH-D00: U1.D18 U4.5 | length 4.6
  Top Layer w0.076: U1.D18@50.4,14.9 50.65,15.15 51.112,15.15 51.163,15.1 51.35,15.1 51.7,15.1 v2(51.8,15.2) ; v2(51.15,16.95) U4.5@51.15,17.495
  L3-SIG w0.076: v2(51.15,16.95) 51.05,16.85 51.05,15.35 51.3,15.1 51.35,15.1 51.45,15.2 v2(51.8,15.2)
  other v5: 51.8,15.2 51.15,16.95
FLASH-D01: U1.D19 U4.2 | length 17.2
  Top Layer w0.076: U4.2@43.85,20.035 46.75,19.7 47.2,19.7 49,17.9 v2(49.05,17.6) ; v2(50,18.25) 50.7,18.35 51.55,18.35 52.05,17.85 52.05,16.8 52.3,16.55 53.8,16.55 53.9,16.45 53.9,15.05 53.8,14.95 52.2,14.95 52.15,14.9 U1.D19@50.9,14.9
  L3-SIG w0.076: v2(49.05,17.6) 49.7,18.25 v2(50,18.25)
  other v5: 49.05,17.6 50,18.25
FLASH-D02: R2.1 U1.G18 U4.3 | length 45.9
  Top Layer w0.076: U4.3@43.85,18.765 43.89,18.725 45.325,18.725 45.35,18.75 v2(46.8,18.75) ; v2(49.3,20) 49.3,20.4 49.55,20.65 49.55,21.7 50.3,22.45 v2(55.5,22.45) ; U1.G18@50.4,13.4 v2(50.65,13.65) ; v2(55.7,13.3) 57.35,13.3 58.05,14 58.05,14.9 v3(57.65,15.3) ; v3@57.5,13.45 57.5,13.4 v3(57.575,13.325)
  L3-SIG w0.076: v2(46.8,18.75) 47.6,19.55 48.85,19.55 v2(49.3,20) ; v1(49.05,11.65) v1@49.15,11.65 ; v1@49.15,11.625 49.15,11.925 49.625,12.4 49.625,12.625 v2(50.65,13.65) 50.65,14 v1(50.9,14.25) ; v1(55.225,9.05) v1(56.625,10.45) ; v5@55.6,13.3 v2(55.7,13.3)
  L4-SIG w0.076: v1(49.05,11.65) 49.05,11.575 48.875,11.4 48.85,11.35 48.85,11.15 48.875,11.1 49.225,10.75 49.3,10.45 v6(49.3,10.05) ; v1(50.9,14.25) 51.05,14.1 v6(51.05,13.55) ; v6(56.25,18.7) 56.25,18.3 56.8,17.75 v6(56.8,17.3) ; v1(56.625,10.45) 57.175,11 57.2,11.05 57.2,12.65 v3(57.575,13.325)
  Bottom Layer w0.076: v6(49.3,10.05) 49.45,10.05 49.55,9.95 49.575,9.95 49.6,9.925 50.475,9.925 50.5,9.9 50.55,9.875 50.6,9.85 50.625,9.85 50.65,9.825 50.675,9.825 50.7,9.8 50.725,9.8 50.775,9.75 50.8,9.75 51.575,8.975 51.6,8.975 51.625,8.95 51.65,8.95 51.675,8.925 53.925,8.925 54.175,8.675 54.2,8.675 54.45,8.425 54.75,8.425 54.9,8.575 v1(55.225,9.05) ; v4@50.95,13.45 v6(51.05,13.55) ; v2(55.5,22.45) 55.5,22.101 R2.1@55.449,22.05 55.15,21.751 55.15,20.55 55,20.4 55,19.3 55.6,18.7 v6(56.25,18.7) ; v6(56.8,17.3) 56.8,16.15 v3(57.65,15.3)
  other v1: 55.5,22.45
  other v4: 55.225,9.05 49.3,10.05 51.05,13.55 56.8,17.3 56.25,18.7 55.5,22.45
  other v5: 55.7,13.3 50.65,13.65 46.8,18.75 49.3,20 55.5,22.45
  other v6: 55.225,9.05 55.5,22.45
FLASH-D03: R6.1 U1.F18 U4.7 | length 16.5
  Top Layer w0.076: v2(50.15,14.15) U1.F18@50.4,13.9 ; v2(52.75,18.35) 52.75,18.525 51.24,20.035 U4.7@51.15,20.035 51.235,19.95 55.15,19.95 55.5,20.3 55.5,21 56.15,21.65 v2(56.75,21.65)
  L3-SIG w0.076: v2(50.15,14.15) 50.75,14.75 v1(50.85,14.75)
  L4-SIG w0.076: v1(50.85,14.75) 50.55,15.05 50.55,16.95 50.9,17.3 51.1,17.3 51.2,17.2 52.35,17.2 52.75,17.6 v2(52.75,18.35)
  Bottom Layer w0.076: R6.1@56.649,22.05 56.75,21.949 v2(56.75,21.65)
  other v1: 52.75,18.35 56.75,21.65
  other v4: 56.75,21.65
  other v5: 50.15,14.15 52.75,18.35 56.75,21.65
  other v6: 56.75,21.65
FPGA-CCLK: U1.C11 U4.6 | length 10.3
  Top Layer w0.076: v2(45.7,17.5) 47,17.5 v2(47.8,18.3) ; v3(46.4,14.9) U1.C11@46.9,15.4 ; v2(49.85,18.65) 49.965,18.765 U4.6@51.15,18.765
  L3-SIG w0.076: v2(45.7,17.5) 45.3,17.5 45.1,17.3 45.1,17.1 46.4,15.8 v3(46.4,14.9) ; v2(47.8,18.3) 49.5,18.3 v2(49.85,18.65)
  other v5: 45.7,17.5 47.8,18.3 49.85,18.65
FPGA-DONE: R4.7 R4.15 U1.U12 | length 20.7
  Top Layer w0.076: U1.U12@47.475,8.425 v2(47.5,8.425) ; R4.15@58.45,16.178 R4.15@58.522,16.178 ; v2(58.75,14.85) 58.8,14.85 59.05,15.1 59.05,15.65 R4.15@58.522,16.178 ; v2(59.15,18.05) 59.15,17.9 59.05,17.8 59.05,16.7 R4.15@58.522,16.178 ; v2(59.45,19.25) 59.45,19.55 60.078,20.178 R4.7@60.15,20.178
  L3-SIG w0.076: v2(47.5,8.425) 48.85,8.675 48.9,8.7 v1(49.35,8.8) ; v2(59.15,18.05) 59.15,18.45 59.45,18.75 v2(59.45,19.25)
  L4-SIG w0.076: v1(49.35,8.8) 51.85,9.95 52.6,9.95 53.3,10.65 54.4,10.65 v6(55.2,11.45)
  Bottom Layer w0.076: v6(55.2,11.45) 56.35,11.45 58.45,13.55 58.45,14.55 v2(58.75,14.85)
  other v1: 58.75,14.85
  other v4: 55.2,11.45 58.75,14.85
  other v5: 47.5,8.425 58.75,14.85 59.15,18.05 59.45,19.25
  other v6: 58.75,14.85
FPGA-INIT#: R1.1 U1.U11 | length 14.3
  Top Layer w0.076: U1.U11@46.9,8.4 v3(46.9,8.9)
  L4-SIG w0.076: v3(46.9,8.9) 47.25,8.9 47.925,9.575 v6(47.925,9.6) ; v6(50.5,8.825) 51.175,7.9 51.2,7.85 51.2,7.825 51.225,7.8 51.7,6.725 51.7,6.7 51.725,6.675 51.725,6.65 51.75,6.625 51.75,6 v6(54.1,6)
  Bottom Layer w0.076: v6(47.925,9.6) 49.25,9.7 49.3,9.725 49.5,9.725 49.55,9.7 v6(50.5,8.825) ; v6(54.1,6) R1.1@57.8,4.55
  other v4: 54.1,6 50.5,8.825 47.925,9.6
FPGA-TCK: R4.11 R5.2 U1.C8 | length 87.4
  Top Layer w0.076: v3(44.9,14.9) U1.C8@45.4,15.4 ; v2(55.3,21.275) 55.475,21.275 56.025,21.825 56.05,21.825 56.075,21.85 56.5,21.85 56.6,21.95 56.9,21.95 57.1,21.75 57.225,21.5 57.225,20.15 57.6,19.775 R4.11@58.1,19.55
  L3-SIG w0.076: v1(18.4,14.6) 21.3,13.8 24.6,12.1 v1(26.2,11.7) ; v1(28.7,11.4) 32.1,11.4 38.5,10.2 38.6,10.2 v1(39,10.6) ; v1(42.1,12.5) 43,14.9 43.3,15.3 44.5,15.3 v3(44.9,14.9) ; v1(54.5,21.275) v2(55.3,21.275)
  L4-SIG w0.076: v6(16.4,16.1) 17.9,14.6 v1(18.4,14.6) ; v1(26.2,11.7) v6(26.9,11.2) ; v6(38.3,24.4) 39,25.1 47.3,25.1 49.4,23 51.6,22.8 53.8,22 v6(55.4,20.1) ; v1(39,10.6) 40.8,10.8 42.1,11.9 v1(42.1,12.5) ; v1@54.475,21.225 v1(54.5,21.275)
  Bottom Layer w0.076: v6(16.4,16.1) 16.2,16.3 16.2,17.4 17.2,19.5 19.831,22.131 19.8,22.131 ; 19.8,22.1 19.8,22.8 19.875,22.875 20.575,22.875 ; 20.548,22.875 20.548,22.848 20.6,22.9 36.8,22.9 37.218,23.318 37.347,23.333 37.502,23.458 37.627,23.613 37.642,23.742 v6(38.3,24.4) ; v6(26.9,11.2) v1(28.7,11.4) ; v6(55.4,20.1) R5.2@56.4,20.1
  other v4: 26.9,11.2 28.7,11.4 16.4,16.1 55.4,20.1 38.3,24.4
  other v5: 55.3,21.275
  other v6: 28.7,11.4
FPGA-TDI: R4.14 U1.W10 | length 29.7
  Top Layer w0.076: U1.W10@46.4,7.4 46.325,7.325 46.325,6.375 v3(46.55,6.15) ; v2(57.75,17) 57.772,16.978 R4.14@58.45,16.978 ; v2(58.2,11.35) 58.85,12 v3(58.85,12.5)
  L3-SIG w0.076: v1(47.9,2.7) 47.95,2.75 49.45,2.75 v1(49.5,2.7) ; v1(55.15,6.2) 57.95,9 57.95,10.55 58,10.6 58,11.15 v2(58.2,11.35)
  L4-SIG w0.076: v3(46.55,6.15) 46.95,5.75 46.95,5.35 v6(47.35,4.95) ; v6(47.35,3.95) 47.6,3.7 47.6,3 v1(47.9,2.7) ; v1(49.5,2.7) 49.8,2.4 v6(50.25,2.4) ; v2(57.75,17) 58.1,17 59.1,16 59.1,15.8 59.05,15.75 59.05,14.7 58.85,14.5 v3(58.85,12.5)
  Bottom Layer w0.076: v6(47.35,3.95) v6(47.35,4.95) ; v6(50.25,2.4) 50.25,3.55 50.35,3.65 50.65,3.65 51,4 51,5.1 51.55,5.65 52.65,5.65 53.3,6.3 55.05,6.3 v1(55.15,6.2)
  other v1: 57.75,17
  other v4: 50.25,2.4 47.35,3.95 47.35,4.95 55.15,6.2
  other v5: 58.2,11.35 57.75,17
  other v6: 55.15,6.2
FPGA-TDO: R4.13 U1.W8 | length 29
  Top Layer w0.076: U1.W8@45.4,7.4 45.325,7.325 45.325,6.375 45.5,6.2 v2(45.5,5.15) ; v2(57.6,7.25) 59.4,9.05 v2(59.4,9.4) ; v2(57.6,17.4) 57.978,17.778 R4.13@58.45,17.778
  L3-SIG w0.076: v1(57.45,16.7) 57.45,17.25 v2(57.6,17.4) ; v1(58.1,14.55) 58.5,14.55 59.7,13.35 59.4,13.05 v2(59.4,9.4)
  L4-SIG w0.076: v2(45.5,5.15) 45.8,5.45 v6(46.2,5.45) ; v1(57.45,16.7) 58.1,16.05 v1(58.1,14.55)
  Bottom Layer w0.076: v6(46.2,5.45) 46.35,5.3 47.25,5.3 48.2,6.25 49.05,6.25 49.1,6.3 49.35,6.3 49.7,5.95 52.15,5.95 53.15,6.95 53.4,6.95 53.7,7.25 v2(57.6,7.25)
  other v1: 45.5,5.15 57.6,7.25
  other v4: 46.2,5.45 57.6,7.25
  other v5: 45.5,5.15 57.6,7.25 59.4,9.4 57.6,17.4
  other v6: 57.6,7.25
FPGA-TMS: R4.12 U1.W9 | length 32.7
  Top Layer w0.076: U1.W9@45.9,7.4 45.9,7.55 46.125,7.775 46.125,7.8 46.15,7.825 v2(46.15,8.15) ; v2(47.25,5.55) 47.25,5.35 48,4.6 v2(48.15,4.6) ; v2(57.6,17.8) 58.378,18.578 R4.12@58.45,18.578
  L3-SIG w0.076: v2(48.15,4.6) v1(48.5,4.25) ; 51,7.6 49.95,6.55 ; v1@52.325,8.975 51.6,8.25 51.6,8.225 51.575,8.2 51.575,8.125 51.325,7.875 51.3,7.875 51.275,7.85 51.25,7.85 49.95,6.55 ; v1(56.35,14.5) 56.6,14.25 v1(56.6,12.45) ; v1(56.5,17.65) 56.65,17.8 v2(57.6,17.8) ; 49.95,6.55 49.95,6.525 49.925,6.5 49.925,6.475 49.9,6.45 v1(49.75,6.05) 49.75,6.3 49.95,6.5 49.95,6.55
  L4-SIG w0.076: v2(46.15,8.15) 46.7,8.15 ; 46.675,8.15 47.025,7.8 47.05,7.8 47.725,7.125 47.725,7.1 47.825,7 v6(48.025,5.65) ; v2(47.25,5.55) 47.75,6.05 47.75,7.1 ; v1(48.5,4.25) 48.55,4.25 49.1,4.8 49.1,5.4 v1(49.75,6.05) 49.4,5.725 49.35,5.7 v6(48.975,5.7) ; v1(52.3,8.95) 52.325,8.975 v6(52.725,9.675) ; v6(56.15,10.65) 56.6,11.1 v1(56.6,12.45) ; v1(56.35,14.5) 56.35,14.55 56.5,14.7 v1(56.5,17.65)
  Bottom Layer w0.076: v6(48.025,5.65) v6(48.975,5.7) ; v6(52.725,9.675) 52.8,9.85 53.6,10.65 v6(56.15,10.65)
  other v1: 47.25,5.55 46.15,8.15
  other v4: 48.025,5.65 48.975,5.7 52.725,9.675 56.15,10.65
  other v5: 48.15,4.6 47.25,5.55 46.15,8.15 57.6,17.8